# Altium PCB PCB-V2.PcbDoc
Units mil, origin at the board's own origin, x right, y up, seen from the top; angles counter-clockwise.
Board outline 3935 x 2939.61 mil, 2 copper layers (Top Layer, Bottom Layer); 61 components, 45 nets, 177 pads, 41 vias.
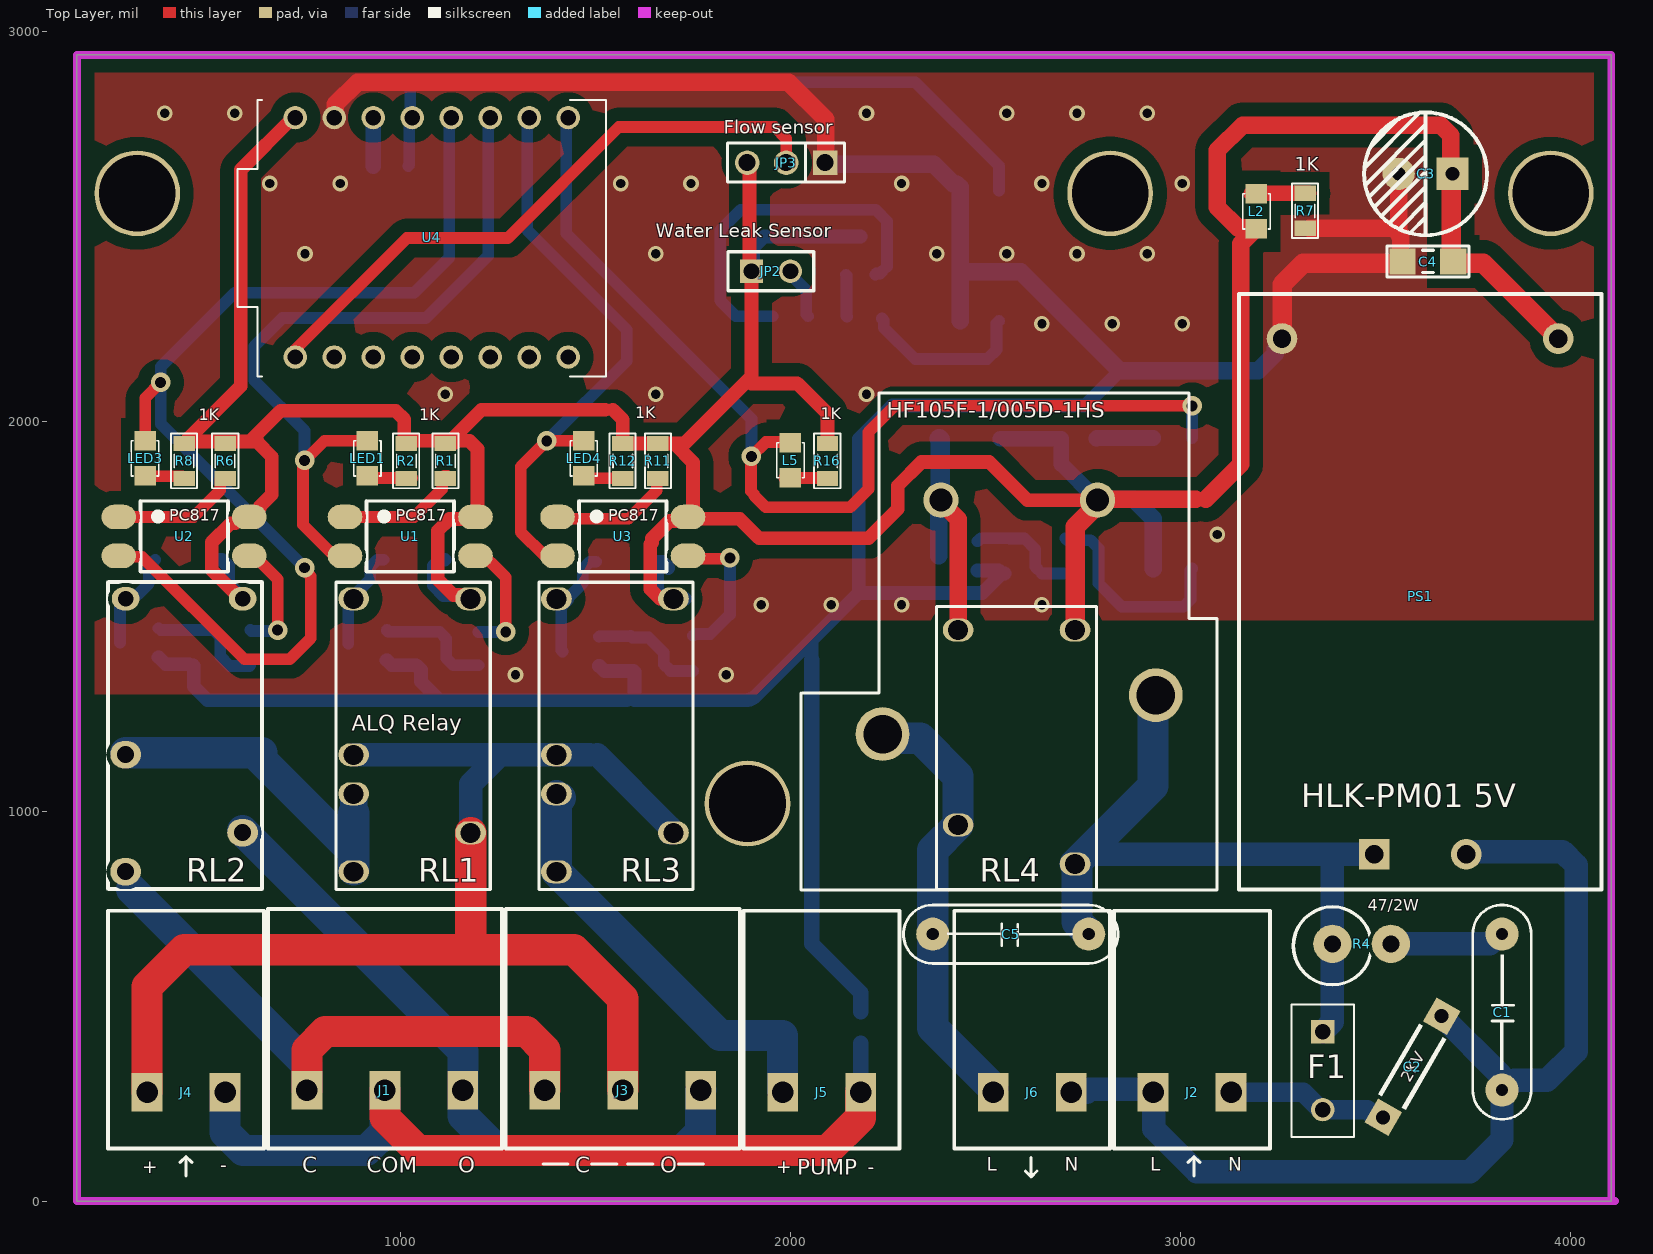
[diagram p0: Top Layer view]
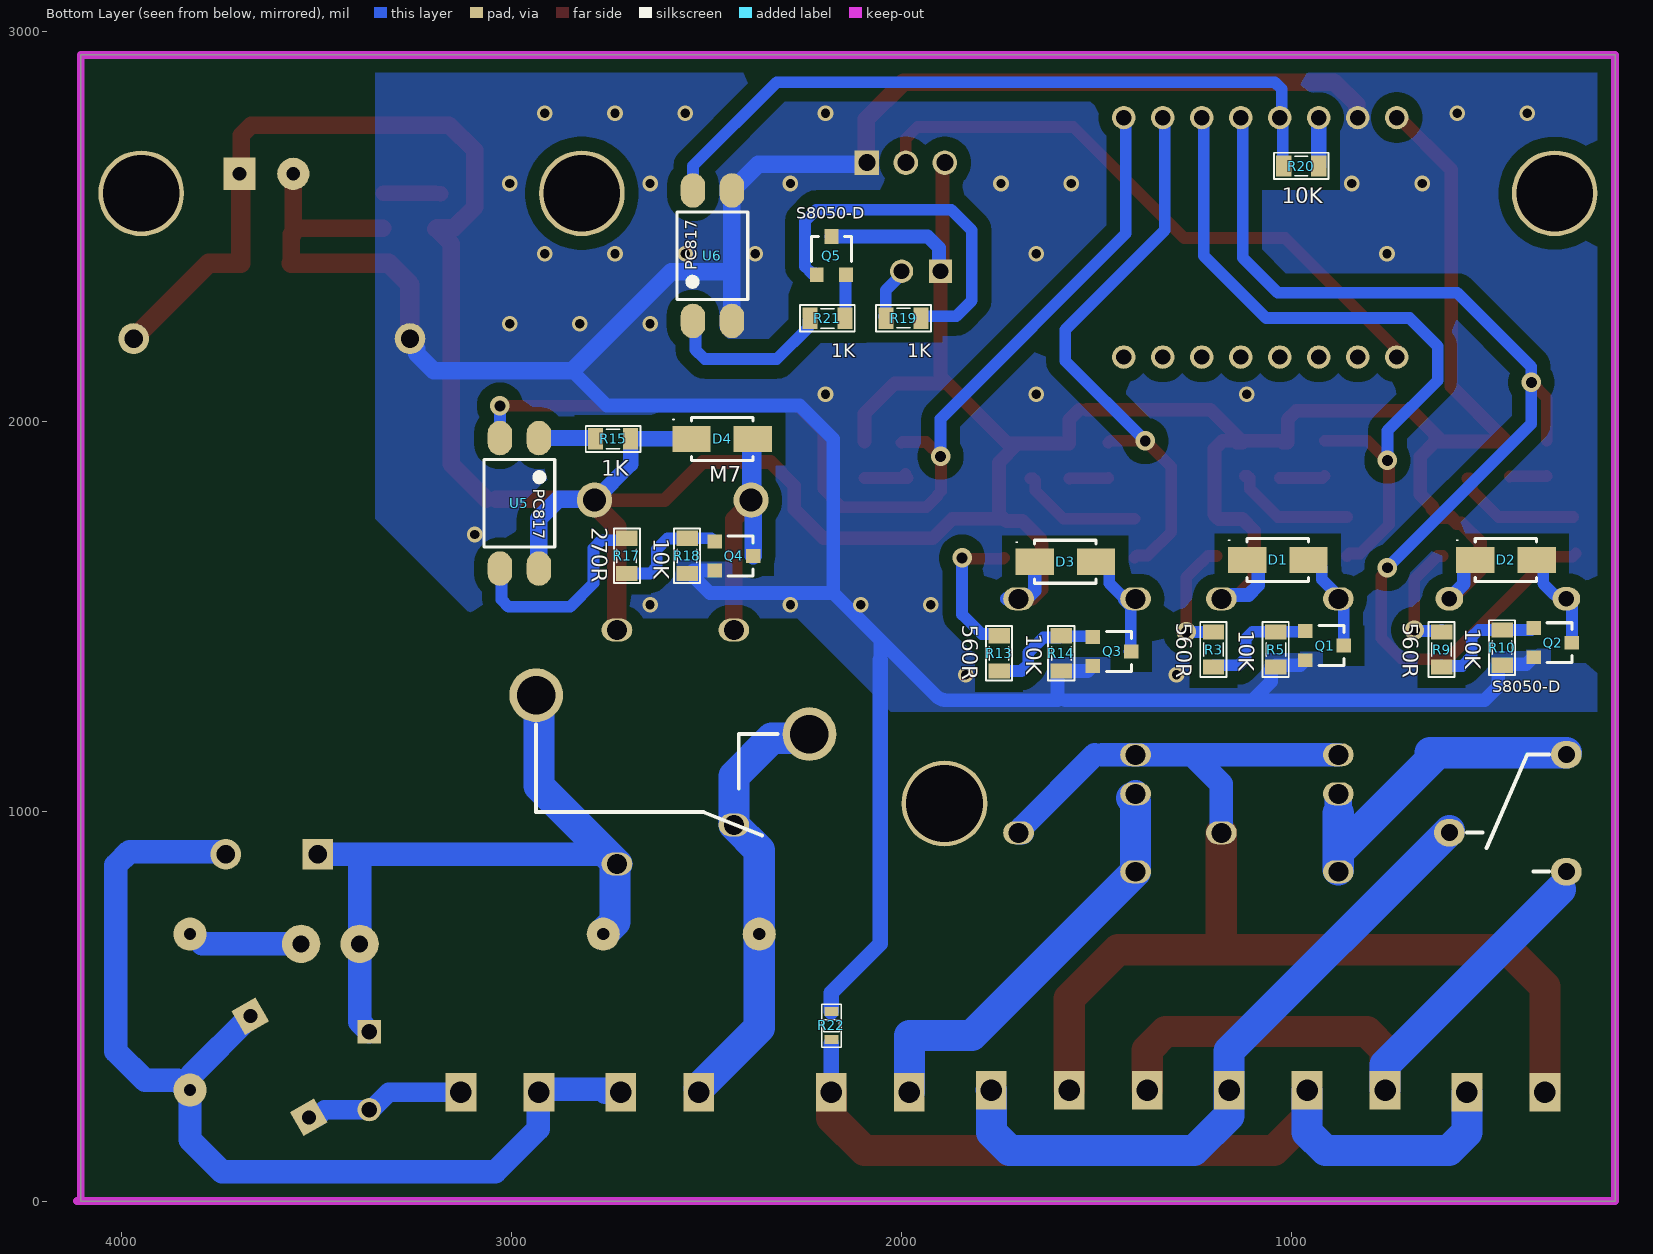
[diagram p1: Bottom Layer view, seen from below]
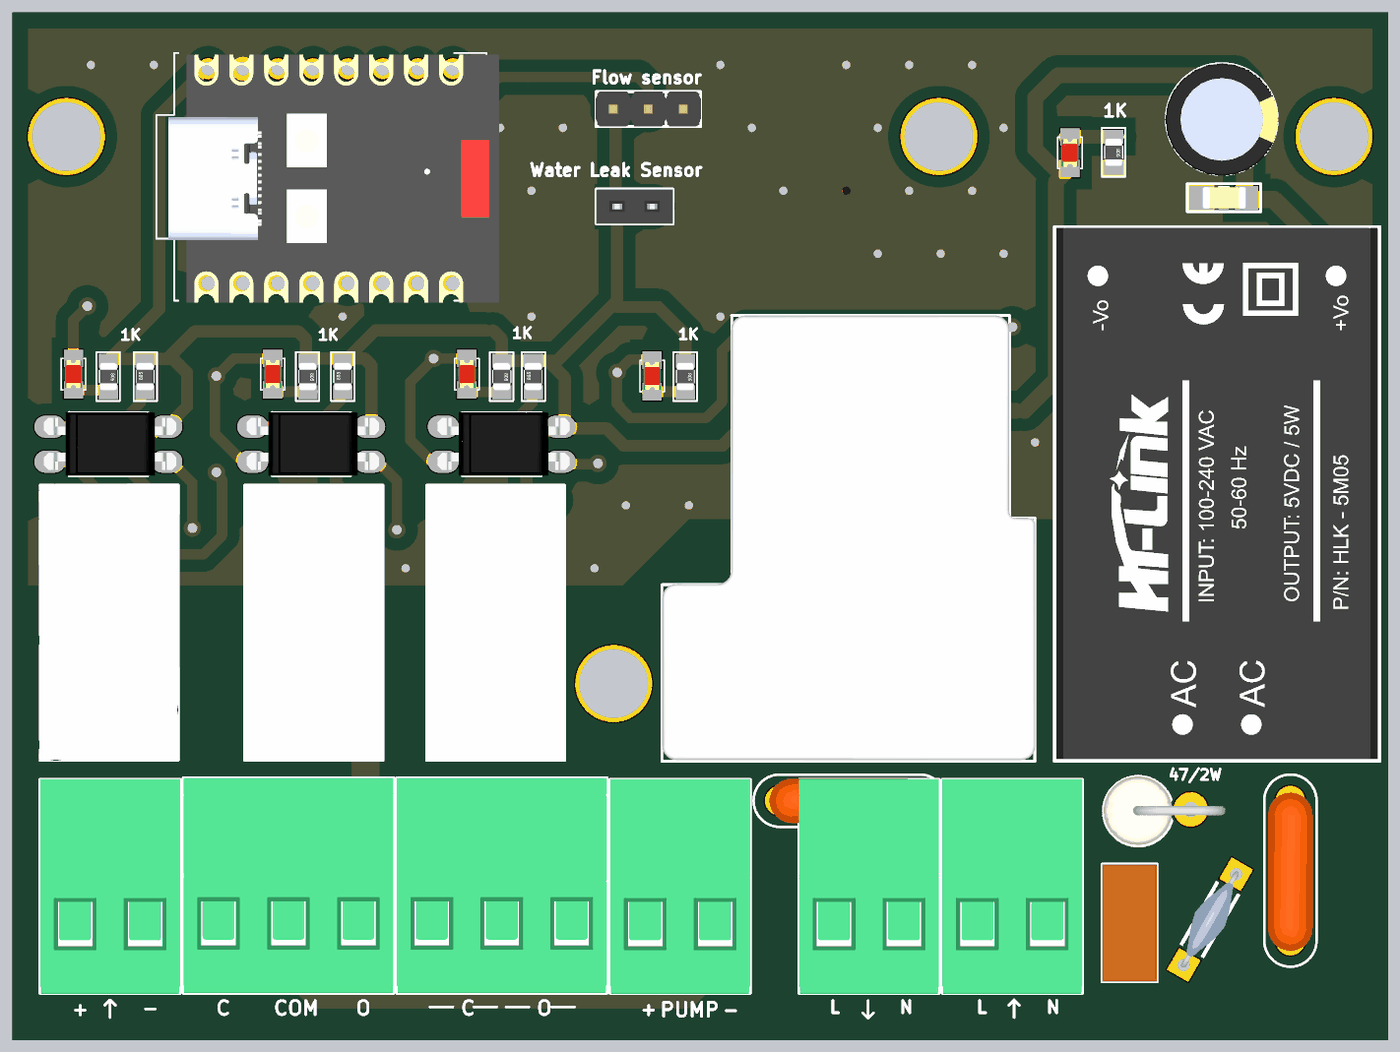
[diagram p2: 3D render of the assembled board from above, using the file's embedded part models]
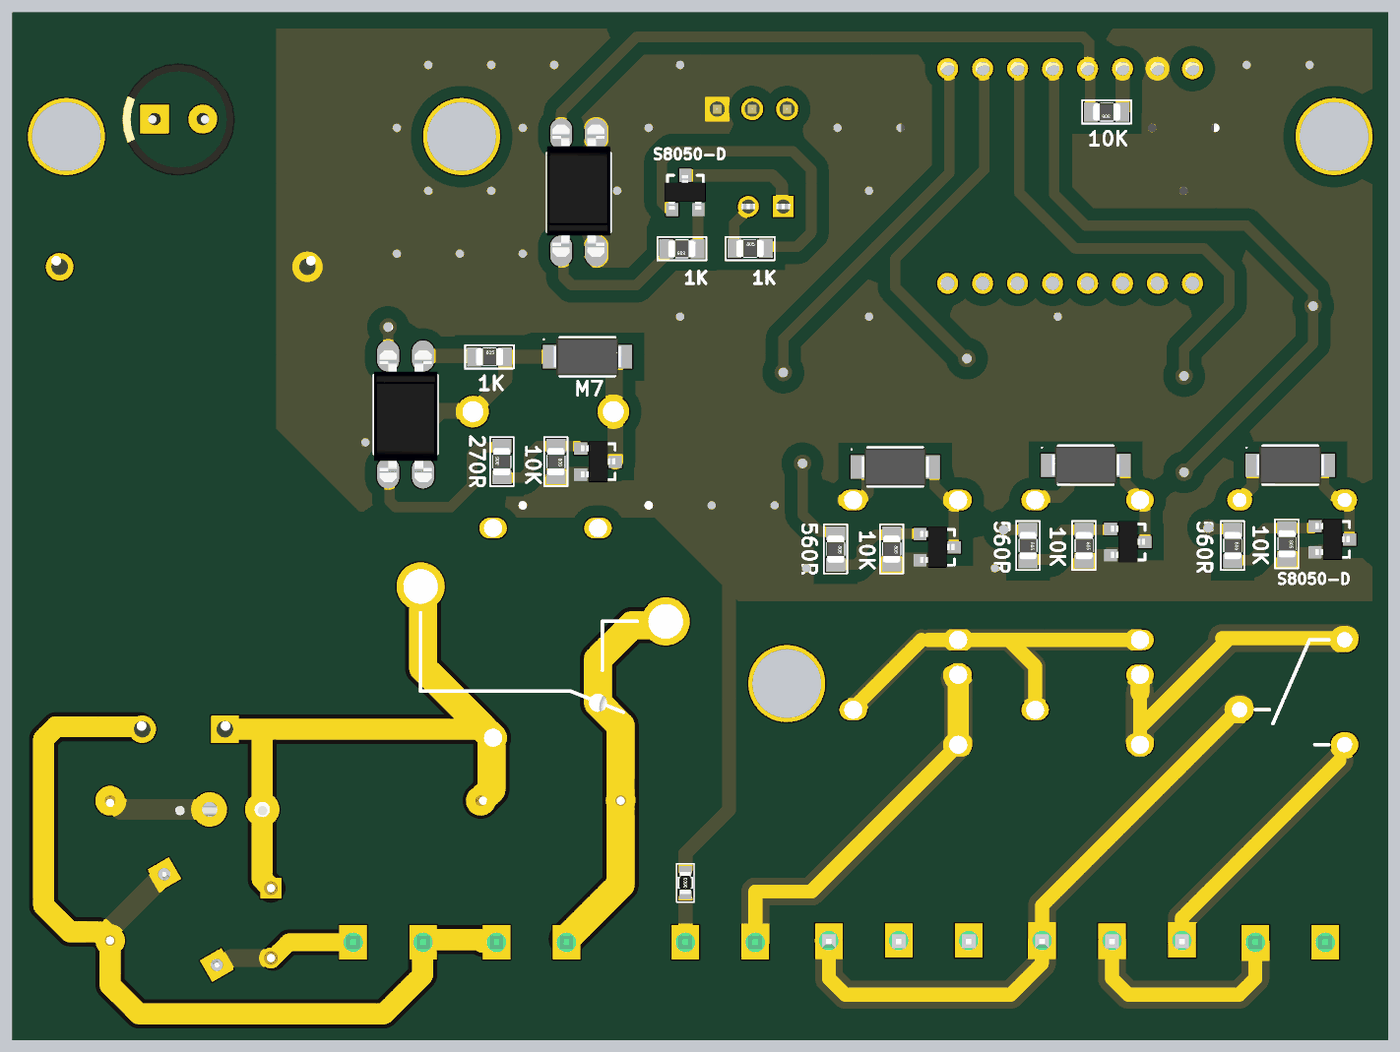
[diagram p3: 3D render of the assembled board from below, using the file's embedded part models]

## Layer stack, top to bottom
Top Solder: solder mask 0.4, Solder Resist, Dk 3.5
Top Layer: signal copper 1.4
Dielectric 1: dielectric 12.6, FR-4, Dk 4.8
Bottom Layer: signal copper 1.4
Bottom Solder: solder mask 0.4, Solder Resist, Dk 3.5

## Board outline
170,0.39 170,2940 4105,2940 4105,0.39

## Design rules (kind name [scope] priority, off if disabled: settings)
Clearance [All] p1: gap=35 ignorepadtopadclearanceinfootprint=FALSE
ComponentClearance ComponentClearance_1 [All] p1: gap=10 collisioncheckmode=3 verticalgap=10 showdistances=FALSE
ComponentClearance [InComponentClass('Componet Optional')] p2: gap=0 collisioncheckmode=3 verticalgap=100000 showdistances=FALSE donotcheckwithout3dbody=TRUE
PlaneConnect [All] p1: planeconnectstyle=Direct reliefexpansion=20 reliefentries=4 reliefconductorwidth=10 reliefairgap=10
PolygonConnect [All] p1: connectstyle=Direct reliefconductorwidth=10 reliefentries=4 polygonreliefangle="90 Angle" airgapwidth=10
RoutingVias [All] p1: holewidth=28 width=50 viastyle="Through Hole" minholewidth=28 minwidth=50 maxholewidth=28 maxwidth=50
SolderMaskExpansion [All] p1: expansion=4 istentingtop=FALSE
SupplyNets "Schematic Supply Nets_3" [InNet('GND')] p1: voltage=0.000
SupplyNets "Schematic Supply Nets_2" [InNet('VCC')] p2: voltage=0.000
SupplyNets "Schematic Supply Nets_1" [InNet('+3.3')] p3: voltage=0.000
SupplyNets "Schematic Supply Nets" [InNet('+5')] p4: voltage=0.000
Width Width_1 [InNetClass('DC_POWER')] p1: maxlimit=50 minlimit=35 preferedwidth=45
Width [All] p2: maxlimit=80 minlimit=30 preferedwidth=40
28 further rules are at their usual default settings.

## Components (designator, comment, footprint, x,y, rotation, side; value= is the part's Value field where it differs from the comment)
C1 "CN" "Cap 10mm" 3825,685 r270 top
C2 "2KV" "Cap 7.5mm" 3670,474.81 r240 top
C3 "1000uF" "tu hoa 8mm" 3628.9,2635 r180 top
C4 "104" "tu 1206" 3635,2410 r0 top
C5 "CN" "Cap 10mm" 2765,685 r180 top
D1 "M7" DO-214AC 1035,1645 r180 bottom
D2 "M7" DO-214AC 450,1645 r180 bottom
D3 "M7" DO-214AC 1580,1640 r180 bottom
D4 "M7" DO-214AC 2460,1955 r180 bottom
F1 "5A" "Fuse rectangular" 3365,435 r270 top value=Fuse
J1 "VALVE" "CON 3 2EDG5.08" 760,285 r0 top
J2 "CON 2" "CON 2 2EDG5.08" 2930,280 r0 top
J3 "VALVE_MAN" "CON 3 2EDG5.08" 1370,285 r0 top
J4 "CON 2" "CON 2 2EDG5.08" 350,280 r0 top
J5 "CON 2" "CON 2 2EDG5.08" 1980,280 r0 top
J6 "CON 2" "CON 2 2EDG5.08" 2520,280 r0 top
JP2 "Water Leak Sensor" "JP 1x2 CT" 1900,2385 r0 top
JP3 "Flow sensor" "JP 1x3 DT" 2088.93,2663.57 r180 top
L2 "POWER" LED-0805-Red 3195,2493.5 r90 top value="LED 3 - 5 ly 2 Colour" (schematic designator LED2)
L5 "LED" LED-0805-Red 2000,1855 r90 top value="LED 3 - 5 ly 2 Colour" (schematic designator LED5)
LED1 "L1" LED-0805-Red 915,1860 r90 top value="LED 3 - 5 ly 2 Colour"
LED3 "L2" LED-0805-Red 345,1860 r90 top value="LED 3 - 5 ly 2 Colour"
LED4 "L3" LED-0805-Red 1470,1860 r90 top value="LED 3 - 5 ly 2 Colour"
PS1 "HLK-PM01 5V" CONV_HLK-5M05-5W 3615,889.59 r90 top
Q1 "S8050-D" SOT23-321 915,1425 r270 bottom
Q2 "S8050-D" SOT23-321 330,1432.5 r270 bottom
Q3 "S8050-D" SOT23-321 1460,1410 r270 bottom
Q4 "S8050-D" SOT23-321 2430,1655 r270 bottom
Q5 "S8050-D" SOT23-321 2180,2425 r180 bottom
R1 "1K" RES-SMD-0805 1115,1898.5 r90 top
R2 "1K" RES-SMD-0805 1015,1898.5 r270 top
R3 "560R" RES-SMD-0805 1200,1415 r270 bottom
R4 "47/2W" R2WD 3590,660 r180 top value="R2W - 47"
R5 "10K" RES-SMD-0805 1040,1415 r270 bottom
R6 "1K" RES-SMD-0805 550,1898.5 r90 top
R7 "1K" RES-SMD-0805 3320,2540 r270 top
R8 "1K" RES-SMD-0805 445,1898.5 r270 top
R9 "560R" RES-SMD-0805 615,1415 r270 bottom
R10 "10K" RES-SMD-0805 460,1420 r270 bottom
R11 "1K" RES-SMD-0805 1660,1898.5 r90 top
R12 "1K" RES-SMD-0805 1570,1898.5 r270 top
R13 "560R" RES-SMD-0805 1750,1405 r270 bottom
R14 "10K" RES-SMD-0805 1590,1405 r270 bottom
R15 "1K" RES-SMD-0805 2740,1955 r180 bottom
R16 "1K" RES-SMD-0805 2095,1898.5 r270 top
R17 "270R" RES-SMD-0805 2705,1655 r90 bottom
R18 "10K" RES-SMD-0805 2550,1655 r270 bottom
R19 "1K" RES-SMD-0805 1995,2265 r180 bottom
R20 "10K" RES-SMD-0805 975,2655 r0 bottom
R21 "1K" RES-SMD-0805 2190,2264 r0 bottom
R22 "0R" RES-SMD-0603 2180,450 r90 bottom
RL1 "ALQ Relay" Relay-10A 880,1545 r270 top
RL2 "ALQ Relay" Relay-LQ-form-C 295,1545.33 r270 top
RL3 "ALQ Relay" Relay-10A 1400,1545 r270 top
RL4 "HF105F-1/005D-1HS" "Relay-HF-30A-Form-A - duplicate" 2787.49,1798.04 r180 top
U1 "PC817" SOP4 1025,1705 r0 top
U2 "PC817" SOP4 445,1705 r0 top
U3 "PC817" SOP4 1570,1705 r0 top
U4 "ESP32-C3" ESP32-C3-PCP 890,-185 r90 top
U5 "PC817" SOP4 2980,1790 r270 bottom
U6 "PC817" SOP4 2485,2425 r90 bottom

## Footprints (in the part's own frame and the unit in brackets; to place one, negate y for a bottom-side part, rotate by r counter-clockwise, add the part's x,y. Pads: shape width x height; smd on the part's side, far side on the other; paste and mask are expansions set on the pad)
"Cap 7.5mm" [mm] "103 2KV"
  rect 1.8x1.8 hole 0.9: 1(0,0) 2(7.62,0)
  silkscreen extent 1.15,-1.03 6.47,1.03, body extent -0.19,-1.2 7.81,1.19, height 9.03
"Cap 10mm" [mil] "Cap np W 0.4"
  round 85 hole 31: 1(0,0) 2(400,0)
  silkscreen extent -75,-75 475,75, body extent -25,-64 431,64, height 236
"CON 2 2EDG5.08" [mm]
  rect 2x2.5 hole 1.4: 1(0,0) 2(5.08,0)
  silkscreen extent -2.54,-3.68 7.62,11.81, body extent -2.54,-3.74 7.62,11.87, height 21.08
"CON 3 2EDG5.08" [mm]
  rect 2x2.5 hole 1.4: 1(0,0) 2(5.08,0) 3(10.16,0)
  silkscreen extent -2.54,-3.81 12.7,11.81, body extent -2.54,-3.81 12.7,11.8, height 21.08
CONV_HLK-5M05-5W [mm]
  rect 2x2 hole 1.2: 1(0,3)
  round 2 hole 1.2: 2(0,-3) 3(33.6,9) 4(33.6,-9)
  silkscreen extent -2.3,-11.82 36.5,11.8, body extent -2.16,-11.65 36.44,11.65, height 18.65
DO-214AC [mm]
  rect 2.5x1.7 smd: 1(2,0) 2(-2,0)
  silkscreen extent -3.21,-1.4 2,1.4, body extent -2.5,-1.35 2.5,1.35, height 2.2
ESP32-C3-PCP [mil]
  round 60 hole 39.37: 0(2964.17,-540) 1(2964.17,-440) 2(2964.17,-340) 3(2964.17,-240) 3.3(2964.17,-40) 4(2964.17,-140) 5(2350,160) 5V(2964.17,160) 6(2350,60) 7(2350,-40) 8(2350,-140) 9(2350,-240) 10(2350,-340) 20(2350,-440) 21(2350,-540) G(2964.17,60)
  silkscreen extent 2301,-637 3009,308, body extent 2296,-672 3004,273, height 164
"Fuse rectangular" [mil] "5.08 0.6"
  rect 60x60 hole 39.37: 1(0,0)
  round 60 hole 39.37: 2(200,0)
  silkscreen extent -70,-80 270,80, body extent -67,-79 267,79, height 315
"JP 1x2 CT" [mm] "JP 1x2 CT"
  rect 1.52x1.52 hole 1.02: 1(0,0)
  round 1.52 hole 1.02: 2(2.54,0)
  silkscreen extent -1.52,-1.27 4.06,1.27, body extent -1.52,-1.25 4.06,1.25, height 8.51
"JP 1x3 DT" [mm]
  rect 1.6x1.6 hole 1.1: 1(0,0)
  round 1.6 hole 1.1: 2(2.54,0) 3(5.08,0)
  silkscreen extent -1.27,-1.27 6.35,1.27, body extent -1.27,-1.27 6.35,1.27, height 8.54
LED-0805-Red [mil]
  rect 50x55 smd: 1(0,0) 2(90,0)
  silkscreen extent 0,-35 90,35, body extent 5,-25 85,25, height 43
R2WD [mm] "R2W, 2 pin, 150mil"
  round 2.5 hole 1.1: 1(1.27,0) 2(5.08,0)
  silkscreen extent 2.54,-2.51 7.72,2.76, body extent -1.25,-2.41 7.6,2.59, height 13.97
Relay-10A [mm]
  oval 1.5x2 hole 1.3: 1(10.16,0) 1(15.24,7.62) 3(12.7,0) 3(17.78,0) 4(0,0) 5(0,7.62)
  silkscreen extent -1.08,-1.14 18.92,8.89, body extent -1.11,-1.19 18.89,8.81, height 16
"Relay-HF-30A-Form-A - duplicate" [mm]
  round 3.5 hole 2.5: 1(-3.8,12.7) 3(14,15.24)
  oval 2x1.5 hole 1.3: 1(1.46,23.699) 3(9.08,21.159) 4(1.46,8.459) 5(9.08,8.459)
  round 2.3 hole 1.5: 4(0,0) 5(10.2,0)
  silkscreen extent -7.8,-6.99 19.3,25.4, body extent -7.84,-6.99 19.26,25.31, height 20.1
Relay-LQ-form-C [mm]
  oval 1.8x2 hole 1.1: 1(10.16,0) 2(15.24,7.62) 3(17.78,0)
  oval 1.524x1.8 hole 1: 4(0,0) 5(0,7.62)
  silkscreen extent -1.19,-1.25 19.03,9, body extent -1.11,-1.19 18.89,8.81, height 16
RES-SMD-0603 [mm]
  rect 0.6x0.9 smd: 1(-0.889,0) 2(0.927,0)
  silkscreen extent -1.4,-0.64 1.4,0.64, body extent -0.8,-0.4 0.8,0.4, height 0.43
RES-SMD-0805 [mil]
  rect 39.37x55 smd: 1(-45,0) 2(45,0)
  silkscreen extent -70,-34 70,33, body extent -39,-25 39,25, height 31
SOP4 [mm]
  oval 2.25x1.6 smd: 1(-4.25,1.27) 2(-4.25,-1.27) 3(4.25,-1.27) 4(4.25,1.27)
  silkscreen extent -2.96,-2.41 2.96,2.41, body extent -4.67,-2.29 4.93,2.31, height 3.6
SOT23-321 [mm]
  rect 0.9x0.95 smd mask+0: 1(0.95,-1.25)
  rect 0.9x0.95 smd: 2(0,1.25) 3(-0.95,-1.25)
  silkscreen extent -1.3,-0.38 1.3,1.25, body extent -1.52,-1.23 1.48,1.27, height 1.06
"tu 1206" [mm]
  rect 1.7x1.7 smd: 1(-1.65,0) 2(1.65,0)
  silkscreen extent -2.67,-1.02 2.67,1.02, body extent -1.57,-0.8 1.63,0.8, height 0.94
"tu hoa 8mm" [mm]
  rect 2.1x2.1 hole 0.9: 1(-1.75,0)
  round 2.1 hole 0.9: 2(1.75,0)
  silkscreen extent -4,-4 4,4, body extent -4.1,-4.07 4.1,4.13, height 13.81

## Part data
C1 C5: "Capacitor"
C2: library part "Cap 103 2KV", "Capacitor Ceramic 2KV"
C3: library part "Tu Hoa 1000uF 16V 8x20", "Cắm", Chung_Loai=Cắm, Don_Vi=Con, Ma_Hang=MH008300, So_Chan=2, Ten_Linh_Kien="Tụ Hóa 1000uF 16V 8x20MM"
C4: library part "Tu 1206 104 50V 20%", "Dán", Chung_Loai=Dán, Don_Vi=Con, Ma_Hang=MH004544, So_Chan=2, Ten_Linh_Kien="Tụ 1206 104-0.1uF 20% 50V"
D1 D2 D3 D4: library part "Diode 1A", "Diode 1A 1N4007 DO-41"
F1: library part Fuse, "Fuse", Designed by=VanDungEvn
J1 J3: library part "CON 3 EDG", "CON3 KF terminal"
J2 J4 J5 J6: library part "CON 2 EDG", "CON2 KF terminal"
JP2: library part "JP 1x2 2.54 Cai Thang", "Cắm", Chung_Loai=Cắm, Don_Vi=Con, Ma_Hang=MH004006, Ten_Linh_Kien="Jump Đơn Cái 2.54MM 1x20P Thẳng"
JP3: library part "JP 1x3 2.54 Duc Thang", "Cắm", Chung_Loai=Cắm, Don_Vi=Con, Ma_Hang=MH000903, Ten_Linh_Kien="Jump Đơn Đực 2.54MM 1x40P Thẳng 11MM"
L2 L5 LED1 LED3 LED4: library part "LED SMD"
PS1: library part "CONV HLK-PM01", "220VAC to 5V"
Q1 Q2 Q3 Q4 Q5: library part S8050, "S8050-D 25V 1.5A NPN 40V 0.5A NPN", ComponentLink1Description=Datasheet, ComponentLink1URL=https://www.alldatasheet.com/datasheet-pdf/view/433163/MCC/S8050-D.html, ComponentLink2Description=Datasheet2, ComponentLink2URL=https://www.onsemi.com/pdf/datasheet/ss8050-d.pdf
R1 R2 R3 R5 R6 R7 R8 R9 R10 R11 R12 R13 R14 R15 R16 R17 R18 R19 R20 R21 R22: library part Res-SMD, "Resistor", Manufacturer="Generic Components", Class=Passive, Published=08/06/2000, Publisher="Altium Hobart Technology Centre"
R4: library part R2W, "Resistor 2W"
RL1 RL3: library part "Relay 10A", "ALQ Relay 10A or HF32F-G/005-HS", ComponentLink1Description=Datasheet, ComponentLink1URL=https://api.pim.na.industrial.panasonic.com/file_stream/main/fileversion/306
RL2: library part "Relay Panasonic LQ", "ALQ105  10A", ComponentLink1Description=Datasheet, ComponentLink1URL=https://api.pim.na.industrial.panasonic.com/file_stream/main/fileversion/306
RL4: library part "Relay 10A 30A", "HF-105 or HF32F-G/005-HS", ComponentLink1Description=Datasheet, ComponentLink1URL=https://api.pim.na.industrial.panasonic.com/file_stream/main/fileversion/306
U1 U2 U3 U5 U6: library part "OPTO PC817 SMD", "Single Opto"

## Free pads (board coordinates)
  round 220 hole 196.85: ""(325,2585) ""(1890,1020) ""(2820,2585) ""(3950,2585)

## Via types
v1: diameter 40/40 (per signal layer), hole 24, Top Layer to Bottom Layer, tented both sides, 32 vias
v2: diameter 50, hole 28, Top Layer to Bottom Layer, tented both sides, 9 vias

## Nets (pads, with @x,y where several pads share a name; then routed paths per layer and width w, separated by ;. In a path a pad name is that pad's centre, name@x,y a point inside that pad or via, vN(x,y) a via of type N, cw(c..) or ccw(c..) an arc to the next point about the centre after c; other vN are vias at no path point)
+3.3: R20.1 U4.3.3 | length 126.2
  Bottom Layer w40: U4.3.3@925,2779.17 925,2773.76 930,2768.76 R20.1
+5: C3.1 C4.2 D1.2 D2.2 D3.2 D4.2 JP2.1 JP3.3 L2.1 PS1.4 Q5.2 R1.2 R2.1 R6.2 R8.1 R11.2 R12.1 R15.2 R16.1 RL1.5 RL2.5 RL3.5 RL4.4 U1.4 U2.4 U3.4 U4.5V U5.4 | length 10872.6
  Top Layer w35: R8.1@452.81,1945 455,1947.19 R8.1@455,1948.5 ; RL2.5@595,1550 585,1550 515.53,1619.47 515.53,1689.79 564.74,1739 575.95,1739 591.95,1755 U2.4 ; U2.4@617.54,1755 639.11,1776.57 639.11,1781.79 670,1812.68 670,1909.5 633.18,1946.31 ; 633.18,1948.5 613.5,1948.5 ; U4.5V@725,2780 590,2645 590,2090 455,1955 R8.1@455,1948.5 ; R2.1@1022.67,1945.69 1010,1945.69 1010,2005 987.5,2027.5 692.5,2027.5 622.25,1957.25 613.5,1948.5 ; R2.1@1022.67,1950 1127.65,1950 1207.65,2030 1524.75,2030 ; R1.2@1125,1945.68 1139.62,1945.68 1143.94,1950 1177.04,1950 1197.54,1929.5 1197.54,1760.22 1186.97,1749.64 1125.66,1749.64 1095.53,1719.51 1095.53,1594.47 1135.22,1554.78 1175.22,1554.78 RL1.5@1180,1550 ; 1544.75,2030 1570.25,2004.5 1570.25,1943.5 R11.2@1671.55,1943.5 ; R11.2@1670,1943.5 1728.5,1943.5 1900,2115 ; RL3.5 1665.5,1545 1640.53,1569.97 1640.53,1684.79 1645,1689.26 1645,1700 1689.64,1744.64 1731.97,1744.64 1737.32,1750 1750,1762.68 1750,1894.93 1703.62,1941.31 ; U3.4@1750,1750 1870,1750 1919.74,1700.26 2200.26,1700.26 2275.21,1775.21 2275.21,1835.21 2335.81,1895.81 2510.05,1895.81 2607.83,1798.04 RL4.4@2787.49,1798.04 ; JP3.3@1890,2660 1895,2655 1895,2390 JP2.1 1900,2115 ; 1900,2097.23 1900,2115 ; 1903.62,2097.23 2017.77,2097.23 2095,2020 R16.1@2095,1947.82 ; R8.1@455,1948.5 560,1948.5 613.5,1948.5
  Top Layer w45: RL4.4@2787.49,1800 3040,1800 ; 3065,1800 3155,1890 3155,2456 3192.5,2493.5 L2.1 3192.5,2496 3148.68,2496 3095,2549.68 3095,2695 3160,2760 3667.54,2760 3693.9,2733.64 C3.1@3693.9,2645
  Top Layer w50: RL4.4@2730,1465 2730,1729.57 2787.49,1787.06 RL4.4@2787.49,1798.04 ; C3.1@3693.9,2645 3694.43,2644.47 3694.43,2405.53 3694.96,2405 3777.17,2405 PS1.4@3969.33,2212.83
  Bottom Layer w30: PS1.4@3965.41,2208.92 PS1.4@3969.33,2212.83
  Bottom Layer w35: D2.2 541.87,1645 557.83,1629.04 557.83,1583.83 591.66,1550 RL2.5@595,1550 ; D1.2 1100.96,1645 1085,1629.04 1085,1580 1110.22,1554.78 1175.22,1554.78 RL1.5@1180,1550 ; D3.2@1687.06,1624.04 1671.09,1640 D3.2 1658.74,1565.5 1679.24,1545 RL3.5 RL3.5@1730,1545 ; JP2.1 1903.9,2388.9 1903.9,2445.19 1932.92,2474.21 Q5.2
  Bottom Layer w40: D4.2 R15.2 2695,1890.52 2785.53,1800 RL4.4@2787.49,1798.04
  Bottom Layer w45: RL4.4@2780.39,1800 2785.53,1800 2880,1800 2930,1750 U5.4
AC_IN: C5.1 F1.1 PS1.1 R4.2 RL4.1 | length 1943
  Bottom Layer w60: RL4.1@2730,865 2738.9,865 2763.48,889.59 3390,889.59 ; F1.1 3390,460 R4.2@3390,649.6 ; R4.2 3390,889.59 ; PS1.1 3390,889.59
  Bottom Layer w80: RL4.1@2730,865 2759.04,894.04 2930,1065 2930,1290.94 RL4.1@2937.1,1298.04 ; RL4.1@2734.69,865 2734.69,716.67 2765,686.35 C5.1
AC_N: C1.2 C2.1 J2.1 J6.2 PS1.2 | length 2594
  Bottom Layer w60: 2760,280 2760,286.83 2760.63,287.46 J2.1@2930,287.46 ; J2.1 2931.56,278.44 2931.56,185.7 3041.86,75.39 3742.93,75.39 3825,157.46 C1.2 3831.76,285 3856.62,309.85 3939.85,309.85 4015,385 4015,861.62 3979.85,896.76 3740.29,896.76 PS1.2 ; C2.1 C1.2@3821.17,323.63
AC_OUT: C5.2 J6.1 RL4.3 | length 1130.1
  Bottom Layer w80: RL4.3@2236.31,1198.04 2247.05,1187.29 2332.71,1187.29 2430,1090 2430,965 2365,900 2365,445 2515,295 2515,293.58 J6.1@2519.37,289.21
FLOW: JP3.2 U4.5 | length 1594.2
  Top Layer w30: U4.5@725,2165.83 730.74,2171.57 730.74,2184.7 1016.27,2470.23 1275.23,2470.23 1560,2755 1960,2755 1989.64,2725.36 1989.64,2660.36 JP3.2@1990,2660
GND: C3.2 C4.1 JP3.1 PS1.3 Q1.1 Q2.1 Q3.1 Q4.1 R5.2 R7.2 R10.2 R14.2 R18.2 R22.2 U4.G U6.2 U6.3 | length 9048.8
  Top Layer w45: U4.G@827.87,2782.87 829.64,2782.87 832.87,2786.1 832.87,2812.87 890,2870 1995,2870 2090,2775 JP3.1@2090,2660 ; R7.2@3330,2495 3550,2495 3560.57,2484.43 ; C3.2@3556.1,2645 3560.57,2640.53 3560.57,2484.43 ; 3560.57,2479.96 3560.57,2484.43 ; C4.1@3565.04,2405 3565.04,2410 3565.04,2479.96 3560.57,2484.43
  Top Layer w50: PS1.3@3260.67,2212.83 3260.67,2350.67 3315,2405 C4.1@3565.04,2405
  Bottom Layer w35: Q2.1 380.2,1395.1 398.11,1377.19 457.81,1377.19 R10.2 467.81,1375 470,1372.82 470,1320 505,1285 1100,1285 ; Q1.1 965.2,1387.6 977.79,1375 1040,1375 1052.5,1362.5 1052.5,1332.5 1100,1285 ; Q3.1 1510.2,1372.6 1522.79,1360 R14.2 1597.81,1360 1600,1357.82 1600,1285 1885.5,1285 ccw(c1885.5,1320) 1910.21,1295.21 2055,1440 ; 1580,1285 1100,1285 ; 2055,1388.19 2055,1440 ; Q4.1 2534.59,1617.6 2542.19,1610 R18.2 ; R18.2 2542.14,1609.96 2492.18,1560 2175,1560 ; 2845,2130 2755.96,2040.96 2260.96,2040.96 2175,1955 2175,1560 ; 2055,1440 2175,1560
  Bottom Layer w40: 2055,1388.19 2055,660 2180,535 R22.2
  Bottom Layer w45: JP3.1@2090,2660 2367.32,2660 2418.76,2608.56 2426.69,2608.56 2435,2600.25 U6.3 2435,2383.84 ; U6.2 2435,2383.84 ; PS1.3 3260.67,2203.29 3243.8,2186.42 3243.8,2173.8 3200,2130 2845,2130 2591.16,2383.84 2435,2383.84
  other v1: 1295,1350 1835,1350 1925,1530 2105,1530 2285,1530 2645,1530 3095,1710 1115,2070 1655,2070 2195,2070 2645,2250 2825,2250 3005,2250 755,2430 1655,2430 2375,2430 2555,2430 2735,2430 2915,2430 665,2610 845,2610 1565,2610 1745,2610 2285,2610 2645,2610 3005,2610 395,2790 575,2790 2195,2790 2555,2790 2735,2790 2915,2790
NetC1_1: C1.1 R4.1 | length 295.4
  Bottom Layer w60: R4.1 3793.24,660 3818.24,685 C1.1
NetC2_2: C2.2 F1.2 J2.2 | length 411.5
  Bottom Layer w50: J2.2 3314.59,280 F1.2@3359.59,235 ; F1.2 3479.21,235 3499.21,215 C2.2
NetD1_1: D1.1 Q1.2 RL1.4 | length 261.7
  Bottom Layer w30: Q1.2@865.79,1430 865.79,1533.1 880,1547.32 880,1550 880,1552.68 922.05,1594.73 922.05,1626.54 940.51,1645 D1.1
NetD2_1: D2.1 Q2.2 RL2.4 | length 264.6
  Bottom Layer w30: Q2.2 280.79,1533.1 295,1547.32 295,1550 300.74,1555.74 325.74,1555.74 354.11,1584.11 354.11,1627.85 D2.1
NetD3_1: D3.1 Q3.2 RL3.4 | length 278.3
  Bottom Layer w30: Q3.2@1415.79,1410 1414.8,1410 1412.09,1412.72 1412.09,1524.4 1430,1542.32 1430,1547.68 1467.05,1584.73 1467.05,1621.54 1485.51,1640 D3.1
NetD4_1: D4.1 Q4.2 RL4.5 | length 661.4
  Top Layer w45: RL4.5@2385.92,1798.04 2385.92,1792.98 2430,1748.9 RL4.5@2430,1465
  Bottom Layer w45: Q4.2 2380.79,1792.91 RL4.5@2385.92,1798.04 ; RL4.5@2423.96,1465 RL4.5@2430,1465
  Bottom Layer w50: D4.1 2383.59,1952.67 2383.59,1800.36 RL4.5@2385.92,1798.04
NetLED1_1: LED1.1 R2.2 | length 117.1
  Top Layer w30: LED1.1 920,1855 R2.2@1030,1855
NetLED2_2: L2.2 R7.1 | length 133.8
  Top Layer w40: L2.2@3182.5,2583.5 L2.2@3182.81,2583.81 ; L2.2@3196.5,2585 3196.82,2584.69 R7.1@3329.69,2584.69
NetLED3_1: LED3.1 R8.2 | length 95.9
  Top Layer w30: LED3.1 345.75,1859.25 439.5,1859.25 R8.2@440.25,1858.5
NetLED4_1: LED4.1 R12.2 | length 100.9
  Top Layer w30: LED4.1@1470,1855 1470.75,1854.25 1569.5,1854.25 R12.2@1570.25,1853.5
NetLED5_1: L5.1 R16.2 | length 110
  Top Layer w30: L5.1@1985,1855 R16.2@2095,1855
NetQ1_3: Q1.3 R3.2 R5.1 | length 302.7
  Bottom Layer w30: Q1.3@965.41,1465.12 965.41,1462.82 967.91,1460.32 1099.93,1460.32 1117.5,1442.74 1117.5,1392.58 1135.07,1375 R3.2@1200,1375
NetQ2_3: Q2.3 R9.2 R10.1 | length 306.3
  Bottom Layer w30: Q2.3 380.2,1469.9 385.1,1465 519.93,1465 537.5,1447.43 537.5,1397.26 561.97,1372.79 612.79,1372.79 R9.2@615,1375
NetQ3_3: Q3.3 R13.2 R14.1 | length 295.9
  Bottom Layer w30: Q3.3 1510.51,1448.7 R14.1@1590,1448.7 ; R14.1 1594.36,1445.64 1636.46,1445.64 1675,1407.11 1675,1377.58 1692.57,1360 R13.2
NetQ4_3: Q4.3 R17.1 R18.1 | length 287.5
  Bottom Layer w30: Q4.3 2480.2,1692.4 2487.8,1700 R18.1 2562.09,1700 2562.5,1699.59 2600.41,1699.59 2627.5,1672.5 2627.5,1627.57 2645.07,1610 R17.1@2700,1610
NetQ5_1: Q5.1 R21.1 | length 107.8
  Bottom Layer w30: Q5.1 2143.8,2374.59 2143.8,2270.2 R21.1@2145,2269
NetQ5_3: Q5.3 R19.2 | length 949.4
  Bottom Layer w30: R19.2@1955,2270 1860,2270 1820.08,2309.92 1820.08,2490.08 1872.91,2542.91 2218.43,2542.91 2247.72,2513.62 2247.72,2397.35 2229.85,2379.49 2220.12,2379.49 2217.4,2376.77 Q5.3
NetR1_1: R1.1 U1.1 | length 322.4
  Top Layer w30: U1.1 1035.56,1755 1107.33,1826.77 1107.33,1855.31 1112.02,1860 R1.1@1119.83,1860
NetR3_1: R3.1 U1.3 | length 310.5
  Top Layer w30: U1.3 1214.05,1655 1230.54,1638.5 1231.5,1638.5 1270,1600 v2(1270,1460)
  Bottom Layer w30: R3.1 v2(1270,1460)
NetR6_1: R6.1 U2.1 | length 327.1
  Top Layer w30: U2.1 470,1755 510,1795 510,1795.72 537.5,1823.22 537.5,1848.81 542.5,1853.81 R6.1@548.47,1853.81
NetR9_1: R9.1 U2.3 | length 299.7
  Top Layer w30: U2.3 625.12,1655 685,1595.12 v2(685,1465)
  Bottom Layer w30: R9.1@615,1465 617.52,1462.48 682.48,1462.48 v2(685,1465)
NetR11_1: R11.1 U3.1 | length 325.4
  Top Layer w30: U3.1@1402.68,1750 1584.64,1750 1657.5,1822.86 1657.5,1848.81 1662.19,1853.5 R11.1@1670,1853.5
NetR13_1: R13.1 U3.3 | length 357.1
  Top Layer w30: U3.3@1737.32,1650 1739.35,1647.97 1842.97,1647.97 v2(1845,1650)
  Bottom Layer w30: R13.1 1754.69,1454.69 1794.69,1454.69 1845,1505 v2@1845,1635
NetR15_1: R15.1 U5.1 | length 147.1
  Bottom Layer w40: R15.1 2785,1957.01 2785.32,1957.32 U5.1
NetR17_2: R17.2 U5.3 | length 535.1
  Bottom Layer w30: R17.2 2709.69,1695.31 2769.69,1695.31 2790,1675 2790,1585 2850,1525 3008.24,1525 3025.81,1542.57 3025.81,1618.49 U5.3
NetR21_2: R21.2 U6.1 | length 434.3
  Bottom Layer w30: R21.2 2239.68,2259.31 2239.68,2240.32 2320,2160 2505,2160 2528.69,2183.69 2528.69,2251.36 U6.1
P_GND: J1.2 J4.2 J5.2 R22.1 | length 2210.5
  Top Layer w80: J1.2 960,215 1045,130 2095,130 2179.37,214.37 2179.37,279.37 J5.2
  Bottom Layer w40: J5.2 R22.1@2180,405
  Bottom Layer w80: J4.2 550,176.86 596.86,130 913.14,130 960,176.86 J1.2
PUMP+: J5.1 RL3.3 | length 1106.8
  Bottom Layer w70: RL3.3@1400,1045 1400,1043.9 RL3.3@1409.45,1034.45
  Bottom Layer w80: RL3.3@1409.45,1034.45 1400,1025 1400,845 1820,425 1980,425 J5.1
R1: LED1.2 U1.2 U4.2 | length 1886.4
  Top Layer w30: U1.2 851.36,1661.31 823.32,1661.31 750,1734.63 750,1895 805,1950 LED1.2
  Bottom Layer w30: v2(753.96,1900) 753.96,1976.04 625,2105 625,2193.08 696.92,2265 1065,2265 1225,2425 U4.2@1225,2780
R2: LED3.2 U2.2 U4.3 | length 2871.4
  Top Layer w30: U2.2@271.36,1661.31 279.5,1653.17 336.83,1653.17 600,1390 716.07,1390 770,1443.93 770,1603.15 753.96,1619.19 v2(753.96,1624.6) ; LED3.2 345,2060 v2(385,2100)
  Bottom Layer w30: v2(753.96,1624.6) 385,1993.56 385,2140 575,2330 1035,2330 1125,2420 U4.3@1125,2780
R3: LED4.2 U3.2 U4.1 | length 1500.7
  Top Layer w30: U3.2@1402.68,1650 1396.36,1656.31 1368.32,1656.31 1308.39,1716.24 1308.39,1883.39 v2(1375,1950) 1465,1950 LED4.2@1470,1945
  Bottom Layer w30: U4.1@1325,2780 1325,2490 1580,2235 1580,2155 v2(1375,1950)
R4: L5.2 U4.0 U5.2 | length 2689.3
  Top Layer w30: v2@1895,1900 1898.83,1896.17 1898.83,1821.17 1907.5,1812.5 1907.5,1809.29 1936.79,1780 2153.47,1780 2200,1826.53 2200,1972.43 2267.57,2040 v2(3030,2040) ; v2(1900,1910) 1937,1947 1998,1947 L5.2
  Bottom Layer w30: U4.0@1425,2780 1425,2481.92 1900,2006.92 v2(1900,1910) ; U5.2 v2(3030,2040)
V_CLOSE: J1.1 J3.1 RL2.3 | length 1556.5
  Top Layer w80: J1.1 760,388.14 806.86,435 1323.14,435 1370,388.14 J3.1
  Bottom Layer w80: 310,800 760,350 J1.1
V_OPEN: J1.3 J3.3 RL2.2 | length 1738.5
  Bottom Layer w80: RL2.2@595,950 1160,385 J1.3 1160.63,284.37 1160.63,219.37 1250,130 1722.51,130 1769.37,176.86 1769.37,284.37 J3.3
VCC: J3.2 J4.1 RL1.1 RL3.1 | length 3231.8
  Top Layer w80: J4.1 350,550 445,645 1200,645 1445,645 1570,520 J3.2 ; 1180,645 RL1.1@1180,945
  Bottom Layer w60: RL1.1@880,1145 1254,1145 1485,1145 ; RL1.1@1180,950 1180,1070 1254,1144 ; 1505,1145 1690.63,959.37 1690.63,945.47 1691.1,945 RL3.1@1700,945
VCC_V+: RL1.3 RL2.1 | length 895.6
  Bottom Layer w70: 880,995 RL1.3@880,1035
  Bottom Layer w80: RL2.1@295,1150 645,1150 ; 625,1150 880,895 ; RL1.3@880,850 880,895 ; 880,995 880,895
WL_Sensor: JP2.2 R19.1 | length 133.6
  Bottom Layer w30: JP2.2 2000,2376.92 2040.32,2336.61 2040.32,2274.69 R19.1@2045,2270
WL_Signal: R20.2 U4.4 U6.4 | length 1868.5
  Bottom Layer w30: R20.2 1022.5,2657.5 1022.5,2777.5 1025,2780 1025,2852.43 1042.57,2870 2320,2870 2535,2655 U6.4
pads on no net: U4.6 U4.7 U4.8 U4.9 U4.10 U4.20 U4.21

## Polygon pours and split planes (outlines as drawn)
GND on Bottom Layer "GND_L02_P000" (solid, remove dead copper, pour order 0): 170,2940 170,1255 495,1255 2027.28,1255 2267.28,1495 3095,1495 3350,1750 3350,2938.82 3351.64,2940.46
GND on Top Layer "GND_L01_P001" (solid, pour order 1): 165,2945 170,2940 170,1300 1915,1300 2105,1490 4105,1490 4105,2935 4100,2940

## Keep-outs
Keep-Out Layer:
  lines w20: 4105,0.39 4105,2940 170,2940 170,0.39 4115,0.39

## Silkscreen, mask and mechanical layers (free items; w line width, h text height)
Top Overlay:
  lines w7.87: 435,100 450,115 ; 450,65 450,115 ; 465,100 450,115 ; 1365,95 1430,95 ; 1490,95 1555,95 ; 1582.5,95 1647.5,95 ; 1712.5,95 1777.5,95 ; 2602.5,77.5 2617.5,62.5 ; 2617.5,112.5 2617.5,62.5 ; 2632.5,77.5 2617.5,62.5 ; 3020,100 3035,115 ; 3035,65 3035,115 ; 3050,100 3035,115
  text "L" at 2503,78 h35
  text "N" at 2703,78 h35
  text "L" at 2923,78 h35
  text "N" at 3123,78 h35
  text "-" at 538,75.51 h35
  text "C" at 748,73 h40
  text "COM" at 913,73 h40
  text "O" at 1148,73 h40
  text "C" at 1448,73 h40
  text "O" at 1665.5,73 h40
  text "+" at 338,72.17 h35
  text "+" at 1963,72.17 h35
  text "-" at 2198,70.51 h35
  text "PUMP" at 2018,68 h40